# Altium PCB TYPEC_4KTransmitter-v1.0.PcbDoc (part 10 of 12)
Units mil, origin at the board's own origin, x right, y up, seen from the top; angles counter-clockwise.
Board outline 2834.7 x 1259.84 mil, 10 copper layers (Top Layer, GND-1, Signal L1, GND-2, PWR-1, PWR-2, GND-3, Signal L2, GND-4, Bottom Layer), stack 61.686 mil thick; 475 components, 338 nets, 2161 pads, 1240 vias.
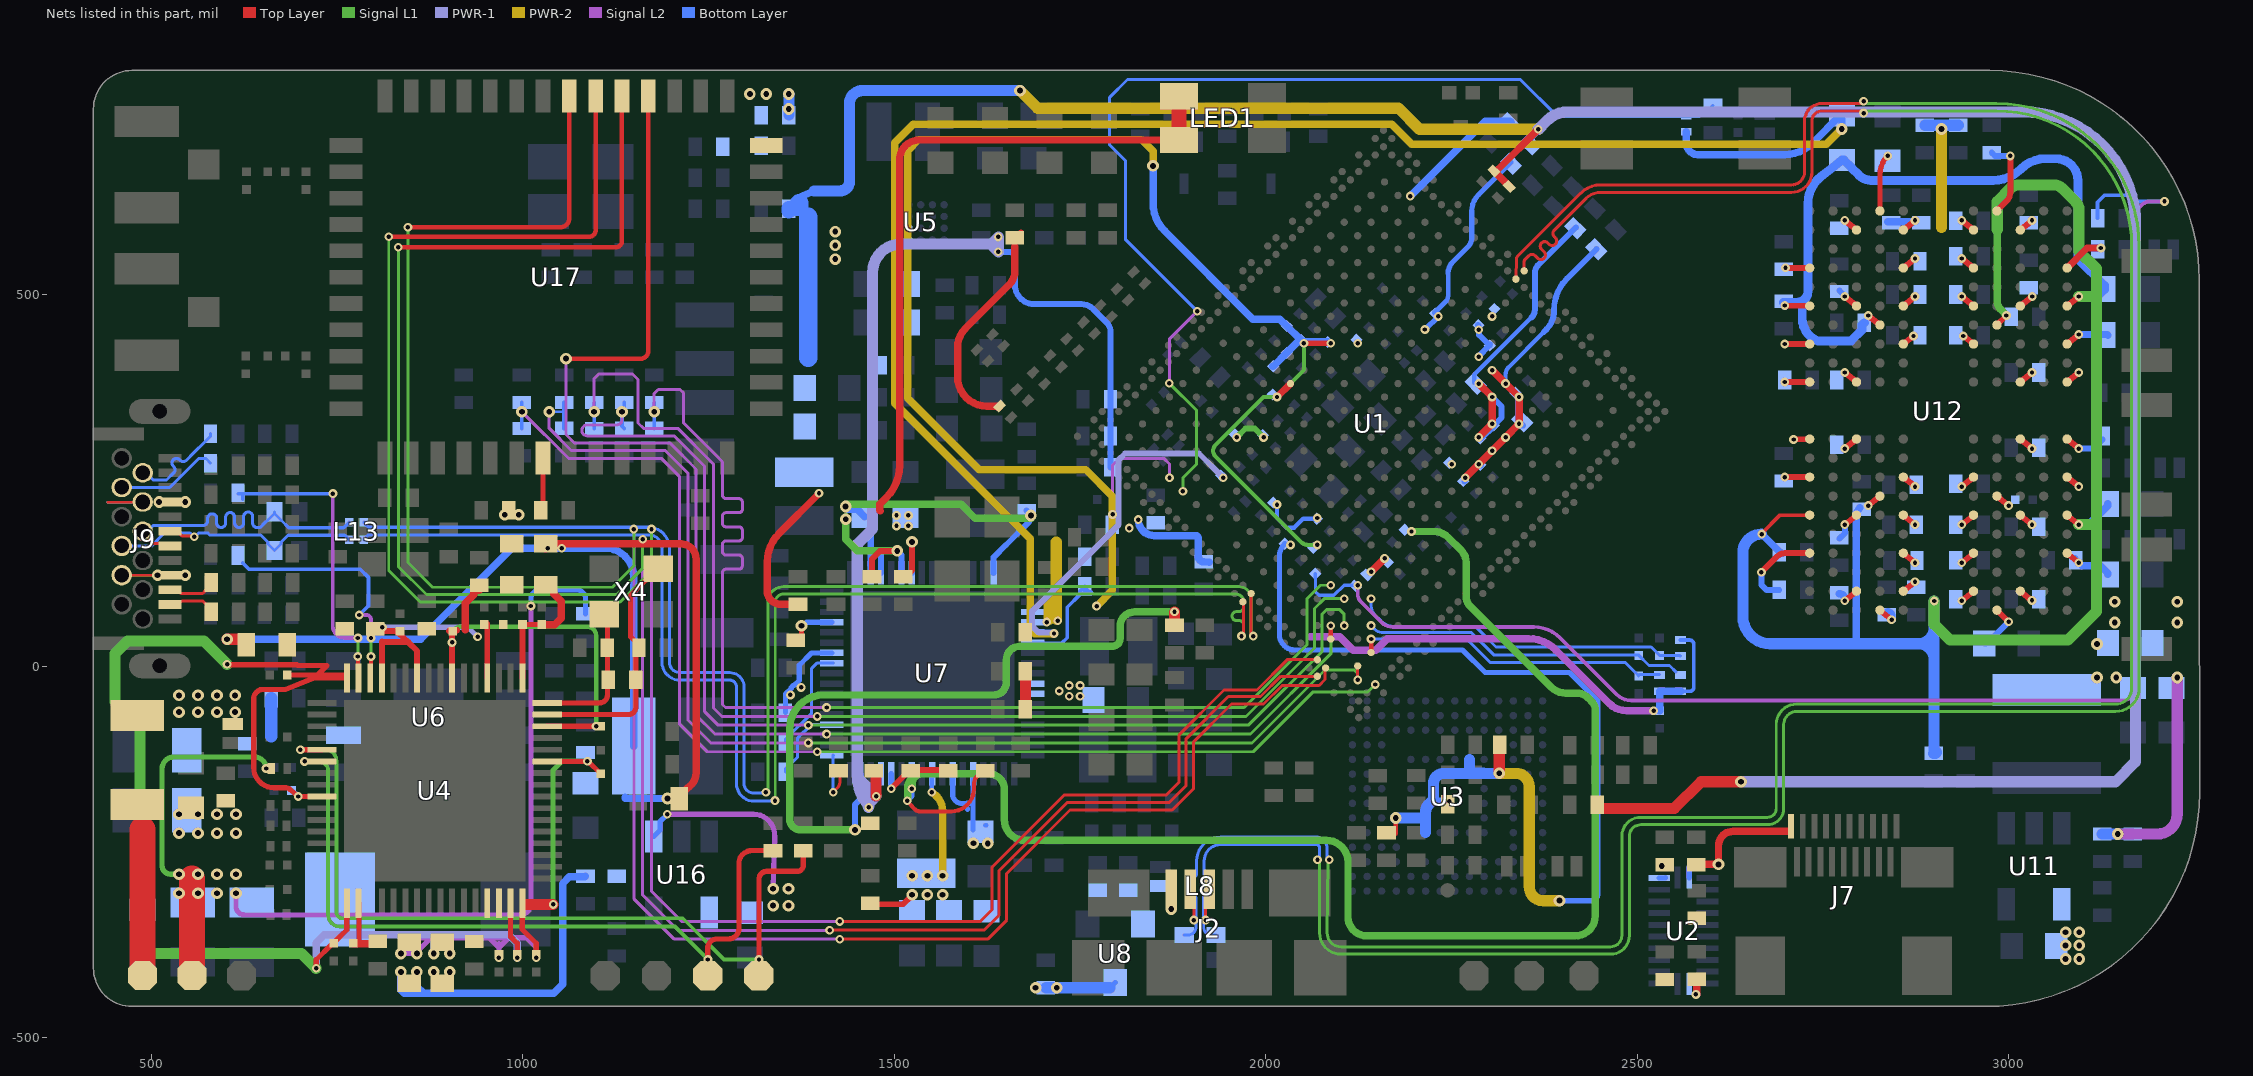
[diagram p16: the nets of this part, all layers, seen from the top]

## Via types
v1: diameter 11.81, hole 5.91, Top Layer to Bottom Layer, tented both sides, 710 vias
v2: diameter 15.75, hole 7.87, Top Layer to Bottom Layer, tented both sides, 265 vias
v3: diameter 11.81, hole 5.91, Top Layer to Signal L1, tented both sides, 146 vias
v4: diameter 11.81, hole 5.91, Signal L2 to Bottom Layer, 60 vias
v5: diameter 11.81, hole 5.91, Signal L1 to Signal L2, 38 vias
v6: diameter 11.81, hole 5.91, Top Layer to Signal L1, 16 vias
v7: diameter 11.81, hole 5.91, Top Layer to Bottom Layer, 4 vias
v8: diameter 11.81, hole 5.91, Signal L1 to Signal L2, tented both sides, 1 vias

## Nets (pads, with @x,y where several pads share a name; then routed paths per layer and width w, separated by ;. In a path a pad name is that pad's centre, name@x,y a point inside that pad or via, vN(x,y) a via of type N, cw(c..) or ccw(c..) an arc to the next point about the centre after c; other vN are vias at no path point) (continued)
SARADC_VIN0/RECOVERY: C156.1 R44.1 R60.1 U1.1D17 | length 2015.7
  Signal L2 w5: v1(2123.94,108.68) 2123.94,96.54 ccw(c2137.17,96.54) 2127.81,87.2 ; 2127.82,87.19 2156.27,58.74 ccw(c2170.99,73.46) 2170.99,52.64 2360.86,52.64 cw(c2360.86,2.34) 2396.41,37.92 ; 2396.42,37.91 2472.54,-38.21 ccw(c2492.17,-18.61) 2492.17,-46.35 3152.31,-46.35 ccw(c3152.31,-25.71) 3172.95,-25.71 3172.95,606.98 cw(c3191.3,606.98) 3191.3,625.32 v4(3209.87,625.32)
  Bottom Layer w4.5: C156.1@2066.81,124.04 2066.81,118.87 2067.15,118.53 2067.15,100.03 2072.17,95.01 2092,95.01 2105.84,108.85 2119.33,108.85 R60.1@2120.72,107.46
  Bottom Layer w5: R44.1@3119.81,602.53 3119.81,624.13 3129.21,633.53 3164.52,633.53 3172.72,625.32 v4(3209.87,625.32)
SARADC_VIN1/HW_ID: C157.1 R61.2 U1.1C17 | length 456.6
  Bottom Layer w4.1: v1(2142.04,90.59) 2142.04,81.15 ccw(c2159.94,81.15) 2147.28,68.49 2154.83,60.94 ccw(c2173.03,79.15) 2173.03,53.4 2282.31,53.4 2310.01,25.7 2353.13,25.7 2518.89,25.7 C157.1@2530.35,14.25 2557.58,14.25 R61.2@2558.6,13.23
SARADC_VIN2: C158.1 R62.2 U1.1B18 | length 435.9
  Bottom Layer w4.1: v1(2142.04,54.4) 2146.81,49.62 ccw(c2158.33,61.15) 2158.33,44.85 2277.11,44.85 2306.95,15.01 2501.59,15.01 2515.98,0.62 2543.68,0.62 R62.2@2552.67,-8.37
SARADC_VIN3: C159.1 R63.2 U1.1A19 | length 426.6
  Top Layer w6: U1.1A19@2142.04,18.2 v1(2142.04,36.3)
  Bottom Layer w4.1: v1(2142.04,36.3) 2270.83,36.3 2302.11,5.02 2483.81,5.02 2498.36,-9.52 2498.49,-9.52 2502.21,-13.24 C159.1@2502.21,-13.38 ; C159.1@2502.48,-11.61 R63.2@2530.11,-11.61
SCL_LT: R125.2 TP11.1 U4.21 | length 1083.6
  Top Layer w7: v3(700.96,-112.66) U4.21@729.93,-112.66 ; v3@1318.14,-394.28 1318.14,-286.77 cw(c1328.59,-286.77) 1328.59,-276.33 1369.82,-276.33 ccw(c1369.82,-268.46) 1377.68,-268.46 R125.2@1377.68,-248.51
  Signal L1 w5: v3(700.96,-112.66) 734.44,-112.66 cw(c734.44,-127.71) 749.49,-127.71 749.49,-331.57 ccw(c757.42,-331.57) 757.42,-339.49 1215.67,-339.49 1271.17,-394.99 v3(1318.16,-394.99)
SDA_LT: R126.2 TP12.1 U4.22 | length 1032.4
  Top Layer w7: v3(706.5,-128.41) U4.22@729.93,-128.41 ; TP12.1@1249.13,-416.62 1249.37,-416.62 v3(1249.37,-394.99) 1249.13,-394.99 1249.13,-379.92 cw(c1261.71,-379.92) 1261.71,-367.34 1277.19,-367.34 ccw(c1277.19,-353.45) 1291.08,-353.45 1291.08,-265.92 cw(c1308.49,-265.92) 1308.49,-248.51 R126.2@1336.98,-248.51
  Signal L1 w5: v3(706.5,-128.41) 707.42,-129.33 727.09,-129.33 cw(c727.09,-140.4) 738.16,-140.4 738.16,-334.66 ccw(c754.07,-334.66) 754.07,-350.58 1204.96,-350.58 v3(1249.37,-394.99)
SDMMC1_CLK: R68.1 U17.18 | length 70
  Top Layer w7: R68.1@1027.38,209.74 U17.18@1027.38,279.73
SDMMC1_CMD: R57.1 R135.2 U1.B35 | length 1605.8
  Signal L1 w4: v5(1396.45,-115.42) 1983.34,-115.42 2064.02,-34.74 2137.82,-34.74 v1(2147.61,-24.95)
  Signal L2 w4: v2(998.94,342.23) 1061.68,279.49 1186.6,279.49 1210.84,255.24 1210.84,-77.77 1248.49,-115.42 v5(1396.45,-115.42)
  Bottom Layer w5: R57.1@998.95,319.75 v2(998.94,342.23) R135.2@998.94,354.73
SDMMC1_D0: R80.1 R138.2 U1.1C19 | length 1605.7
  Signal L1 w4: v5(1384.66,-79.71) 1976.8,-79.71 2075.82,19.32 2075.82,69.68 2081.89,75.74 2099.83,75.74 2105.85,69.72 v1(2105.85,54.4)
  Signal L2 w4: v2(1133.68,342.23) 1133.68,331.42 cw(c1126.88,331.42) 1126.88,324.62 1087.41,324.62 ccw(c1087.41,316.95) 1079.73,316.95 ccw(c1086.81,316.95) 1086.81,309.87 1203.63,309.87 1245.12,268.38 1245.12,-61.54 1263.29,-79.71 v5(1384.66,-79.71)
  Bottom Layer w5: v2(1133.68,342.23) 1133.68,322.76 R80.1@1136.68,319.76 ; v2@1136.67,342.23 R138.2@1136.67,354.73
SDMMC1_D1: R81.1 R139.2 U1.1E18 | length 1605.7
  Signal L1 w4: v5(1409.18,-55.89) 1971.12,-55.89 2055.45,28.44 2055.45,90.23 2073.91,108.68 v1(2087.75,108.68)
  Signal L2 w4: v2(1177.11,342.23) 1177.11,366.77 1182.58,372.24 1211.93,372.24 1216.5,367.68 1216.5,327.28 1268.93,274.85 1268.93,230.08 ccw(c1273.68,230.08) 1273.68,225.33 1291.03,225.33 cw(c1291.03,220.58) 1295.78,220.58 1295.78,211.08 cw(c1291.03,211.08) 1291.03,206.33 1273.68,206.33 ccw(c1273.68,201.58) 1268.93,201.58 1268.93,192.08 ccw(c1273.68,192.08) 1273.68,187.33 1291.03,187.33 cw(c1291.03,182.58) 1295.78,182.58 1295.78,173.08 cw(c1291.03,173.08) 1291.03,168.33 1273.68,168.33 ccw(c1273.68,163.58) 1268.93,163.58 1268.93,154.08 ccw(c1273.68,154.08) 1273.68,149.33 1291.03,149.33 cw(c1291.03,144.58) 1295.78,144.58 1295.78,135.08 cw(c1291.03,135.08) 1291.03,130.33 1273.68,130.33 ccw(c1273.68,125.58) 1268.93,125.58 1268.93,-51.67 1273.15,-55.89 v5(1409.18,-55.89)
  Bottom Layer w5: R81.1@1177.11,319.76 R139.2@1177.11,354.73
SDMMC1_D2: R70.1 R137.2 U1.1D18 | length 1605.7
  Signal L1 w4: v5(1396.45,-67.8) 1973.5,-67.8 2065.68,24.38 2065.68,77.34 2078.93,90.59 v1(2105.85,90.59)
  Signal L2 w4: v2(1096.24,342.23) 1096.24,386.63 1102.62,393.01 1147.95,393.01 1155.46,385.5 1155.46,326.94 1162.54,319.86 1208.78,319.86 1257.02,271.62 1257.02,-56.6 1268.22,-67.8 v5(1396.45,-67.8)
  Bottom Layer w5: R70.1@1096.25,319.75 R137.2@1096.24,354.73
SDMMC1_D3: R69.1 R136.2 U1.1A20 | length 1605.7
  Top Layer w4: v1(2123.94,-18.73) U1.1A20@2123.95,0.11
  Signal L1 w4: v5(1384.66,-103.52) 1981.86,-103.52 2080.11,-5.26 2119.41,-5.26 2123.94,-9.8 v1(2123.94,-18.73)
  Signal L2 w4: v2@1035.71,342.13 1035.81,342.03 1035.81,320.02 1065.61,290.22 1192.03,290.22 1222.75,259.5 1222.75,-72.84 1253.42,-103.52 v5(1384.66,-103.52)
  Bottom Layer w4: v2(1035.81,342.23) 1055.81,342.23
  Bottom Layer w5: R69.1@1055.81,319.76 1055.81,342.23 R136.2@1055.81,354.73
SYNC_KEY: R39.1 R82.2 U1.1P20 | length 1466
  Signal L1 w4: v5(1870.45,380.69) 1906.88,344.27 1906.88,271.54 1888.71,253.37 v1(1888.71,235.35)
  Signal L2 w4.1: v5@1870.42,381.39 1870.42,439.91 v4(1907.89,477.38)
  Bottom Layer w4.1: v4(1907.89,477.38) 1811.7,573.57 1811.7,679.69 1790.06,701.33 1790.06,765.37 1814.21,789.52 2342.78,789.52 2392.53,739.77 2565.24,739.77 R82.2@2566.2,740.73 2567.17,739.77 2583.68,739.77 2591.64,747.73 2595.22,747.73 R39.1@2602.17,754.68
TSADC_SHUT_M0: R45.2 U1.1R20 | length 182.3
  Signal L2 w4: v4(1794.08,204.06) 1794.08,270.32 1803.27,279.51 1862.93,279.51 1870.61,271.83 v1(1870.61,253.44)
  Bottom Layer w4: R45.2@1793.68,190.07 1793.68,203.66 v4(1794.08,204.06)
TX1_N: C56.1 J9.A3 | length 63.5
  Top Layer w4.1: J9.A3@527.62,102.82 534.93,102.82 540.03,97.72 569.31,97.72 573.53,101.94 573.9,101.94 580.86,108.9 C56.1@580.86,112.42
TX1_P: C57.1 J9.A2 | length 63.1
  Top Layer w4.1: J9.A2@527.62,83.14 531.21,86.73 540.57,86.73 541.46,87.62 569.55,87.62 573.64,83.53 573.9,83.53 580.86,76.58 C57.1@580.86,73.11
TX2_N: C58.1 J9.B3 | length 136.4
  Bottom Layer w4.1: J9.B3@462.4,240.36 J9.B3@463.05,239.71 ; J9.B3@463.05,240.21 524.95,240.21 530.37,245.63 560.99,276.25 563.95,279.21 573.71,279.21 C58.1@579.86,273.06
TX2_P: C59.1 J9.B2 | length 136.5
  Bottom Layer w4.1: J9.B2@490.73,260.03 493.14,260.03 502.87,250.31 520.77,250.31 530.38,259.92 ccw(c526.1,264.19) 530.38,268.47 529.79,269.05 cw(c534.07,273.33) 529.79,277.61 cw(c534.07,273.33) 538.35,277.61 538.93,277.03 ccw(c543.21,281.31) 547.49,277.03 556.81,286.35 572.64,302.18 572.91,302.18 579.86,309.13 C59.1@579.86,312.63
TYPEC0_CC1: R116.1 U4.14 | length 331.9
  Top Layer w5.1: U4.14@794.89,-16.21 795.81,-15.29 795.81,12.64 v3(795.93,12.76)
  Signal L1 w4: v3(795.93,12.76) v5(795.93,37.69)
  Signal L2 w5: v4(780.04,68.58) 790.06,68.58 cw(c790.06,62.72) 795.93,62.72 v5(795.93,37.69)
  Bottom Layer w5: R116.1@623.36,138.73 631.72,130.37 781.57,130.37 792.68,119.27 792.68,81.22 v4(780.04,68.58)
TYPEC0_CC2: R117.1 U4.15 | length 405.9
  Top Layer w5.1: v3(778.11,12.76) 778.23,12.64 778.23,-15.3 U4.15@779.14,-16.21
  Signal L1 w4: v3@778.25,12.9 v5(778.25,37.69)
  Signal L2 w5: v4(744.6,232.03) 744.6,53.45 ccw(c760.36,53.45) 760.36,37.69 v5(778.25,37.69)
  Bottom Layer w5: R117.1@617.59,232.03 v4(744.6,232.03) ; R117.1@623.36,224.53 R117.1@623.36,228.03
U4_XTAL0: C1.2 R1.1 U4.63 X4.1 | length 330.1
  Top Layer w7: U4.63@1033.07,-65.42 1142.01,-65.42 ccw(c1142.01,-54.87) 1152.56,-54.87 1152.56,-18.7 C1.2@1152.56,24.77 ; C1.2@1153.56,25.77 1153.56,31.27 1151.06,33.77 1150.87,33.77 1145.25,39.38 1145.25,94.97 1166.38,116.09 1166.38,116.5 1180.18,130.3 X4.1@1182.56,130.3
U4_XTALI: C2.2 R1.2 U4.64 X4.3 | length 197.7
  Top Layer w7: U4.64@1033.07,-49.67 1103.64,-49.67 ccw(c1103.64,-39.21) 1114.1,-39.21 C2.2@1114.1,24.77 1114.1,65.32 X4.3@1109.73,69.7
UART1_CTS: U1.G37 U17.42 | length 2974.7
  Top Layer w4: v1(1426.98,-343.73) 1615.99,-343.73 1631.47,-328.25 1631.47,-271.08 1728.61,-173.94 1865.99,-173.94 1883.18,-156.75 1883.18,-93.27 1944.1,-32.35 1988.32,-32.35 2029.13,8.46 U1.G37@2069.66,8.46
  Top Layer w6: v3(819.82,577.66) 1089.35,577.66 ccw(c1089.35,586.55) 1098.25,586.55 U17.42@1098.25,767.13
  Signal L1 w4: v3(819.82,577.66) 819.82,128.51 862.07,86.26 1131.31,86.26 1173.48,128.43 v5(1173.48,184.29)
  Signal L2 w4: v5(1173.48,184.29) 1173.48,-303.17 1214.05,-343.73 v1(1426.98,-343.73)
UART1_RTS: U1.F37 U17.43 | length 2903.8
  Top Layer w4: v1(1426.96,-367.65) 1625.9,-367.65 1651.47,-342.08 1651.47,-279.36 1736.89,-193.94 1874.28,-193.94 1903.18,-165.03 1903.18,-102.01 1954,-51.19 1997.26,-51.19 2022.37,-26.08 2072.13,-26.08 2080.08,-18.13 2080.08,-3.39 U1.F37@2080.8,-2.67
  Top Layer w6: v3(845.63,590.64) 1050.82,590.64 ccw(c1050.82,602.63) 1062.81,602.63 U17.43@1062.81,767.13
  Signal L1 w4: v3(845.63,590.64) 845.63,139.2 878.84,105.99 1120.94,105.99 1149.67,134.73 v5(1149.67,184.29)
  Signal L2 w4: v5(1149.67,184.29) 1149.67,-313.18 1204.14,-367.65 v1(1426.96,-367.65)
UART1_RXD: U1.1C20 U17.40 | length 2090.8
  Top Layer w6: v2(1058.36,413.73) 1159.11,413.73 ccw(c1159.11,423.6) 1168.99,423.6 1168.99,746.98 U17.40@1169.11,767.13 ; U1.1C20@2087.76,36.3 v1@2087.76,54.39
  Signal L1 w4: v5(1409.18,-91.61) 1979.75,-91.61 2087.75,16.39 ; 2087.75,16.39 v1(2087.75,54.13) 2087.75,16.39
  Signal L2 w4: v2(1058.36,413.73) 1058.36,311.43 1069.9,299.88 1198.64,299.88 1233.47,265.05 1233.47,-66.2 1258.88,-91.61 v5(1409.18,-91.61)
UART1_TXD: U1.F38 U17.41 | length 2949
  Top Layer w4: v1(1413.13,-355.73) 1413.23,-355.64 1620.92,-355.64 1641.47,-335.09 1641.47,-275.22 1732.75,-183.94 1870.14,-183.94 1893.18,-160.89 1893.18,-97.86 1949.85,-41.19 1993.12,-41.19 2020.5,-13.81 U1.F38@2069.66,-13.81
  Top Layer w6: v3(832.73,563.72) 1125.64,563.72 ccw(c1125.64,571.76) 1133.68,571.76 U17.41@1133.68,767.13
  Signal L1 w4: v3(832.73,563.72) 832.73,133.86 870.5,96.08 1126.25,96.08 1161.58,131.41 v5(1161.58,170.46)
  Signal L2 w4: v5(1161.58,170.46) 1161.58,-308.17 1209.1,-355.68 v1@1413.18,-355.68
USB2.0_D_N: D6.1 J2.2 L8.4 | length 118.8
  Top Layer w4.1: J2.2@1898.58,-300.61 cw(c1898.58,-305.5) 1903.47,-305.5 v1(1903.47,-341.97)
  Bottom Layer w4.1: D6.1@1890.53,-362.16 1895.5,-362.16 ccw(c1895.5,-351.34) 1906.33,-351.34 1906.33,-344.83 ccw(c1903.47,-344.83) v1(1903.47,-341.97) ccw(c1903.47,-339.15) 1906.3,-339.15 1906.3,-312.57 ccw(c1899.54,-312.57) L8.4@1899.54,-305.81
USB2.0_D_P: D7.1 J2.3 L8.3 | length 119.7
  Top Layer w4.1: v1(1919.29,-341.97) 1919.29,-305.5 cw(c1924.17,-305.5) J2.3@1924.17,-300.61
  Bottom Layer w4.1: L8.3@1923.16,-305.81 ccw(c1923.16,-312.57) 1916.4,-312.57 1916.4,-339.08 ccw(c1919.29,-339.08) v1(1919.29,-341.97) ccw(c1919.29,-344.83) 1916.43,-344.83 1916.43,-351.34 ccw(c1927.26,-351.34) 1927.26,-362.16 D7.1@1933.15,-362.16
USB2_HOST2_D_N: L8.2 U1.V1 | length 3450.1
  Top Layer w4.1: U1.V1@2348.05,531.83 2348.05,544.4 cw(c2352.15,544.4) 2348.94,546.95 2354.27,552.27 cw(c2358.54,547.99) 2362.82,552.27 2366.33,548.76 ccw(c2370.61,553.04) 2374.89,557.32 2371.38,560.83 cw(c2375.66,565.11) 2379.93,569.38 2381.57,567.75 ccw(c2385.84,572.03) 2390.12,576.31 2388.49,577.94 cw(c2392.77,582.22) 2388.49,586.5 2431.41,629.42 cw(c2450.83,610) 2446.49,637.12 cw(c2450.83,610) 2448.54,637.37 2450.83,637.46 2707.93,637.46 ccw(c2707.93,664.96) 2735.43,664.96 2735.43,733.57 cw(c2748.9,733.57) 2748.9,747.04 2802.05,747.04 cw(c2802.05,744.19) v3(2804.91,744.19)
  Signal L1 w4: v1(2085.74,-260.82) 2085.49,-260.92 2083.83,-262.58 2082.83,-359.45 ccw(c2101.28,-359.45) 2101.28,-377.9 2464.34,-377.9 ccw(c2464.34,-362.71) 2479.53,-362.71 2479.53,-229.13 cw(c2505.04,-229.13) 2505.04,-203.62 2675.43,-203.62 ccw(c2675.43,-191.72) 2687.33,-191.72 2687.33,-78.59 cw(c2714.68,-78.59) 2714.68,-51.24 3144.2,-51.24 ccw(c3144.2,-29.67) 3165.77,-29.67 3165.77,565.18 ccw(c2983.86,565.18) 2983.86,747.09 2807.81,747.09 ccw(c2807.81,744.19) v3(2804.91,744.19)
  Bottom Layer w4.1: L8.2@1899.54,-286.12 ccw(c1899.54,-278.5) 1907.15,-278.5 1907.15,-262.48 cw(c1939.4,-262.48) 1939.4,-230.24 2068.1,-230.24 cw(c2068.1,-244.44) 2078.14,-234.4 2078.72,-234.98 cw(c2068.68,-245.03) 2082.88,-245.03 2082.88,-257.97 ccw(c2085.74,-257.97) v1(2085.74,-260.82)
USB2_HOST2_D_P: L8.1 U1.V2 | length 3450.7
  Top Layer w4.1: U1.V2@2336.92,520.7 2337.95,549.72 2339.44,551.73 2424.3,636.59 cw(c2450.77,610.15) 2450.77,647.56 2509.04,647.56 2707.93,647.56 ccw(c2707.93,664.96) 2725.33,664.96 2725.33,733.57 cw(c2748.9,733.57) 2748.9,757.14 2802.05,757.14 ccw(c2802.05,760) v3(2804.91,760)
  Signal L1 w4: v1(2069.93,-260.82) cw(c2069.93,-263.73) 2072.83,-263.73 2072.83,-359.45 ccw(c2101.28,-359.45) 2101.28,-387.9 2464.34,-387.9 ccw(c2464.34,-362.71) 2489.53,-362.71 2489.53,-229.13 cw(c2505.04,-229.13) 2505.04,-213.62 2675.43,-213.62 ccw(c2675.43,-191.72) 2697.33,-191.72 2697.33,-78.59 cw(c2714.68,-78.59) 2714.68,-61.24 3144.2,-61.24 ccw(c3144.2,-29.67) 3175.77,-29.67 3175.77,565.18 ccw(c2983.86,565.18) 2983.86,757.09 2807.81,757.09 cw(c2807.81,760) v3(2804.91,760)
  Bottom Layer w4.1: L8.1@1923.16,-286.12 cw(c1923.16,-280.21) 1917.25,-280.21 1917.25,-262.48 cw(c1939.4,-262.48) 1939.4,-240.34 2068.1,-240.34 cw(c2068.1,-244.44) 2070.99,-241.54 2071.58,-242.13 cw(c2068.68,-245.03) 2072.78,-245.03 2072.78,-257.97 cw(c2069.93,-257.97) v1(2069.93,-260.82)
USB_5V: D31.1 F1.1 J9.A4 J9.A9 J9.B4 J9.B9 | length 237.6
  Top Layer w3.5: 441.96,220.66 J9.B4@488.73,220.66 ; J9.B9@460.4,122.25 v2(508.73,122.25)
  Top Layer w4: v2@508.3,121.81 v2(508.73,122.25)
  PWR-1 w3.5: 441.96,220.66 J9.B4@488.73,220.66
  PWR-2 w3.5: 441.96,220.66 J9.B4@488.73,220.66 ; J9.B9@460.4,122.25 v2(508.73,122.25)
  other v2: 537.46,-62.07 563,-62.07 588.55,-62.07 613.09,-62.07 537.46,-39.53 563,-39.53 588.55,-39.53 613.09,-39.53 545.98,122.25 510.73,220.67 545.98,220.67
USB_D_N: D30.1 J9.A7 J9.B7 L13.3 | length 374.8
  Top Layer w4.1: J9.A7@525.36,181.3 535.47,181.3 541.97,174.79 557.19,174.79 v1(558.08,173.91)
  Bottom Layer w4.1: J9.B7@462.4,161.62 462.74,161.27 500.11,161.27 518.05,179.21 551.82,179.21 555.55,175.49 v1@558.08,175.49 ; v1(558.08,173.91) 559.03,173.91 564.33,179.21 575.62,179.21 578.49,176.34 647.53,176.34 657.17,166.7 657.17,164.3 D30.1@665.95,155.53 674.72,164.3 674.72,166.5 684.23,176.01 760.42,176.01 L13.3@766.55,169.87
USB_D_P: D29.1 J9.A6 J9.B6 L13.4 | length 435
  Top Layer w4.1: J9.B6@488.73,181.29 488.73,179.08 502.85,164.96 524,164.96 J9.A6@527.36,161.61
  Bottom Layer w4.1: J9.B6@488.73,181.29 495.24,181.29 503.26,189.31 567.98,189.31 570.03,189.31 ccw(c570.03,195.36) 576.08,195.36 576.08,198.83 cw(c582.13,198.83) 588.18,198.83 588.18,192.49 ccw(c594.23,192.49) 600.28,192.49 600.28,200.47 cw(c606.33,200.47) 612.38,200.47 612.38,192.49 ccw(c618.43,192.49) 624.48,192.49 624.48,201.3 cw(c630.53,201.3) 636.58,201.3 636.58,192.49 636.79,190.9 ccw(c642.63,192.49) 642.63,186.44 646.71,186.44 653.73,193.46 656.85,196.58 657.18,196.58 D29.1@665.96,205.36 ; D29.1@665.96,207.53 D29.1@665.96,205.36 ; L13.4@766.55,193.49 759.17,186.11 685.29,186.11 674.81,196.58 674.74,196.58 D29.1@665.96,205.36
USB_OTG0_D_N: L13.1 U1.R38 | length 1910.3
  Top Layer w4.1: v3(1967.54,40.27) ccw(c1967.54,43.18) 1968.54,40.45 ccw(c1967.54,43.18) 1970.44,43.18 1970.44,85.41 U1.R38@1969.44,86.41
  Signal L1 w4: v1@1338.63,-181.17 cw(c1339.81,-181.17) 1339.81,-179.99 1340.01,-179.99 1340.01,85.68 cw(c1351.16,85.68) 1351.16,96.82 1960.19,96.82 cw(c1960.19,86.57) 1970.44,86.57 1970.44,79.33 cw(c1964.39,79.33) 1964.39,73.28 1960.97,73.28 ccw(c1960.97,67.23) 1960.97,61.18 1964.39,61.18 cw(c1964.39,55.13) 1970.44,55.13 1970.44,43.18 cw(c1967.54,43.18) v3(1967.54,40.27)
  Bottom Layer w4.1: L13.1@786.24,169.87 790.1,173.73 790.1,174.23 792.5,176.63 1169.43,176.63 cw(c1169.45,158.63) 1187.45,158.63 1187.45,5.33 ccw(c1211.86,5.33) 1211.86,-19.08 1278.91,-19.08 cw(c1278.91,-28.04) 1287.87,-28.04 1287.87,-158.08 1287.87,-158.14 ccw(c1311.68,-158.14) 1311.75,-181.95 1338.85,-181.95 v1(1339.63,-181.17)
USB_OTG0_D_P: L13.2 U1.R37 | length 1910.3
  Top Layer w4.1: U1.R37@1980.58,97.55 1980.58,43.04 ccw(c1983.35,43.04) v3(1983.35,40.27)
  Signal L1 w4: v1(1327.45,-169.99) ccw(c1327.45,-167.43) 1330.01,-167.43 1330.01,85.68 cw(c1351.16,85.68) 1351.16,106.82 1964.33,106.82 cw(c1964.33,90.71) 1980.44,90.71 1980.44,43.18 ccw(c1983.35,43.18) v3(1983.35,40.27)
  Bottom Layer w4.1: L13.2@786.24,193.49 790.1,189.64 790.1,189.13 792.5,186.73 1169.43,186.73 cw(c1169.45,158.63) 1197.55,158.63 1197.55,5.33 ccw(c1211.86,5.33) 1211.86,-8.98 1278.91,-8.98 cw(c1278.91,-28.04) 1297.97,-28.04 1297.97,-157.99 ccw(c1311.02,-157.99) 1311.02,-171.03 1326.41,-171.03 v1(1327.45,-169.99)
VCC0V6_DDR: C109.2 C111.2 C113.2 C115.2 C117.2 C179.2 C198.2 C200.2 C202.2 C205.1 C207.2 C209.2 C211.2 C213.2 C215.2 C218.2 C221.2 C223.2 C225.2 C227.2 C229.2 C233.2 C237.2 C242.2 C249.2 C250.2 C254.2 C255.2 C256.2 C300.2 L10.2 R98.1 R100.2 R102.2 R103.2 U1.1E6 U1.1E7 U1.1E9 U1.1F5 U1.1G5 U12.AA3 U12.AA5 U12.AA8 U12.AA10 U12.B3 U12.B5 U12.B8 U12.B10 U12.D1 U12.D5 U12.D8 U12.D12 U12.F3 U12.F10 U12.U3 U12.U10 U12.W1 U12.W5 U12.W8 U12.W12 | length 1639.8
  Top Layer w8: v1(2667.36,126.31) 2688.55,147.5 cw(c2699.16,136.9) 2699.16,151.9 U12.W1@2732.35,151.9 ; v1(2699.72,536.05) 2699.87,535.91 2732.21,535.91 U12.D1@2732.35,535.76 ; v1(2779.6,87.92) U12.AA3@2795.34,100.72 ; v1(2779.6,190.28) U12.U3@2795.35,203.08 ; v1(2779.6,497.37) U12.F3@2795.34,484.58 ; v1(2779.6,599.73) U12.B3@2795.34,586.94 ; U12.AA5@2858.34,100.72 v1(2874.09,113.49) ; U12.W5@2858.34,151.9 v1(2874.09,139.1) ; U12.D5@2858.34,535.76 v1(2874.09,548.51) ; U12.B5@2858.34,586.94 v1(2874.09,599.73) ; v1(2937.08,87.92) U12.AA8@2952.82,100.72 ; v1(2937.08,139.1) U12.W8@2952.82,151.9 ; v1(2937.08,548.55) U12.D8@2952.82,535.76 ; v1(2937.08,599.73) U12.B8@2952.82,586.94 ; U12.AA10@3015.82,100.72 v1@3031.15,88.26 ; U12.U10@3015.82,203.08 v1(3031.57,190.28) ; U12.F10@3015.82,484.58 v1@3031.57,497.37 ; U12.B10@3015.82,586.94 v1(3031.57,599.73) ; U12.W12@3078.81,151.9 v1(3094.56,139.1)
  Top Layer w10: v1(2286.8,307.73) 2300.5,321.43 ccw(c2289.9,332.04) U1.1E6@2303.76,326.3 ; v1(2286.8,380.11) v1(2304.9,362.02) ; U1.1E6@2304.05,326.18 2304.74,326.18 2305.24,326.68 U1.1F5@2305.24,361.68 ; U12.D12@3078.81,535.76 3105.64,562.58 v1(3124.31,562.58)
  PWR-2 w15: 2909.86,590.4 v2(2909.86,722.86)
  Signal L2 w15: v2(3146.9,-226.14) 3199.96,-226.14 ccw(c3200.01,-199.16) 3226.98,-199.77 3226.98,-199.64 v2(3226.98,-15.49)
  Bottom Layer w5.7: C115.2@2280.68,392.04 2357.96,469.32
  Bottom Layer w6: C115.2@2280.68,381.04 C115.2@2280.68,391.44
  Bottom Layer w8: v1(2286.8,380.11) 2317.5,349.41 2317.5,334.37 C109.2@2308.95,325.83 ; v1(2304.9,325.83) C109.2@2308.95,325.83 ; C109.2@2308.59,325.46 C109.2@2308.95,325.83 ; 2357.96,469.32 2358.39,469.75 ccw(c2348.8,479.33) 2362.36,479.33 2362.36,528.81 cw(c2377.36,528.81) 2366.74,539.41 C117.2@2417.81,590.48 ; v1(2667.36,126.31) 2667.36,109.27 2674.1,102.53 C202.2@2691.36,102.53 ; C207.2@2772.36,171.27 2779.86,178.77 2779.86,190.03 v1(2779.6,190.28) ; C229.2@2772.36,505.49 2779.6,498.24 v1(2779.6,497.37)
  Bottom Layer w10: v1(2286.8,307.73) C111.2@2290.57,307.73 ; C111.2@2289.85,307.01 C111.2@2290.57,307.73 ; C109.2@2305.63,324.1 C109.2@2305.98,324.1 ; C109.2@2306.3,324.42 2306.46,324.27 2306.46,323.62 C111.2@2290.57,307.73 ; C237.2@2772.36,97.07 cw(c2772.36,89.82) 2779.6,89.82 v1(2779.6,87.92) ; C227.2@2837.36,597.99 2872.34,597.99 v1(2874.09,599.73) ; C221.2@3088.81,144.66 C221.2@3095.18,138.29 ; v1(3094.56,139.1) C221.2@3095.05,139.1 ; C221.2@3099.02,135.13 3123.66,135.13 3133.66,125.13 C255.2@3133.66,123.3
  Bottom Layer w15: R103.2@2887.36,727.86 R102.2@2932.36,727.86 ; C254.2@3126.19,-226.07 R100.2@3167.35,-226.06
  other v1: 3031.57,88.3 2250.61,271.54 3031.97,497.37
  other v2: 3118.98,-15.49 3144.98,-15.49 3226.98,58.51 3226.98,86.51
VCC1V8_DDR: C230.2 C231.2 C234.2 C235.2 C239.2 C240.2 C243.2 C244.2 R99.2 R104.2 U12.F1 U12.F12 U12.G4 U12.G9 U12.T4 U12.T9 U12.U1 U12.U12 | length 3251.2
  Top Layer w5: v1(2667.76,177.49) 2667.76,178.44 2692.4,203.08 U12.U1@2732.36,203.08
  Top Layer w8: v1(2698.81,485.23) 2699.14,484.9 2732.03,484.9 U12.F1@2732.35,484.58 ; v1(2811.1,215.87) U12.T4@2826.84,228.67 ; v1(2811.1,471.78) U12.G4@2826.84,458.99 ; U12.T9@2984.32,228.67 v1(3000.07,215.87) ; U12.G9@2984.32,458.99 v1(2997.16,471.78) ; U12.U12@3078.81,203.08 v1(3094.56,190.28) ; U12.F12@3078.81,484.58 v1(3094.56,497.37)
  Signal L1 w10: 2984.86,587.4 2984.86,490.71 ccw(c2999.86,490.71) 2989.24,480.11 2997.16,472.19 v1(2997.16,471.78)
  Signal L1 w15: v1(2899.86,87.53) 2899.86,56.26 2921.02,35.1 3079.93,35.1 3118.16,73.34 3118.16,190.28 ; 2984.86,587.4 2984.86,625.03 3002.97,643.14 cw(c3013.57,632.53) 3013.57,647.53 3061.14,647.53 cw(c3061.14,632.53) 3071.74,643.14 3090.47,624.42 cw(c3079.86,613.82) 3094.86,613.82 3094.86,558.09 3118.16,534.78 3118.16,497.37 ; v1(3094.56,190.28) 3118.16,190.28 ; v1(3094.56,497.37) 3118.16,497.37 ; 3118.16,190.28 3118.16,497.37
  Bottom Layer w8: v1@2667.36,177.49 v1@2668.16,177.49
  Bottom Layer w10: v1@2668.16,177.49 C235.2@2692.82,152.83 ; 2793.14,30.03 2794.86,31.74 2794.86,200.72 cw(c2811.93,200.72) C243.2@2799.86,212.79 ; v1(3094.56,190.28) 3106.97,190.28 3122.47,205.78 3123.66,205.78 3133.66,215.78 C230.2@3133.66,218.28
  Bottom Layer w12: C240.2@2697.36,489.53 C240.2@2698.81,489.53 ; v1(2698.81,485.23) C240.2@2698.81,489.53 ; 2722.36,489.53 2722.36,468.11 ccw(c2755.35,468.11) 2743.2,437.44 2787.77,437.44 2802.86,452.52 2802.86,459.03 C244.2@2805.86,462.03 ; R104.2@2775.86,681.03 2763.36,671.03 2747.66,658.85 ccw(c2775.86,622.5) 2729.86,622.5 2729.86,503.93 cw(c2715.46,503.93) 2715.46,489.53 C240.2@2698.81,489.53 ; R104.2@2778.36,681.03 2788.36,671.03 2788.36,670.8 2798.88,660.28 ccw(c2814.86,676.26) 2814.86,653.66 2979.34,653.66 ccw(c2979.34,706.59) 3016.76,669.17 cw(c3049.52,636.41) 3049.52,682.73 3063.98,682.73 cw(c3063.98,653.4) 3084.7,674.16 ; 3084.72,674.14 cw(c3063.98,653.4) 3093.32,653.4 3093.32,547.98 3129.17,512.13 C231.2@3129.17,507.52 ; v1(3094.56,497.37) 3112.8,497.37 ccw(c3112.8,512.37) 3123.41,501.76 C231.2@3129.17,507.52 ; C231.2@3129.17,506.99 C231.2@3129.17,507.52 ; C231.2@3129.21,507.57 C231.2@3129.17,507.52
  Bottom Layer w15: v1@2667.36,177.49 ccw(c2667.36,152.49) 2642.36,152.49 2642.36,66.96 ccw(c2679.29,66.96) 2679.29,30.03 2793.14,30.03 2878.64,30.03 ; R99.2@2899.07,-117.63 2901.36,-117.63 R99.2@2902.86,-116.13 ; R99.2@2899.86,-116.13 2899.86,8.82 ; v1(2899.86,87.53) 2899.86,51.24 ; 2878.64,30.03 ccw(c2878.64,51.24) 2899.86,51.24 ; 2878.64,30.03 cw(c2878.64,8.82) 2899.86,8.82 ; 2899.86,8.82 2899.86,51.24
VCC3V3_PMU: C20.2 C118.2 C123.2 R6.1 R7.1 R12.2 R22.1 R109.1 U1.1N15 U1.1P16 U7.31 | length 1795.3
  Top Layer w8: R12.2@1661.09,575.24 R12.2@1662.36,576.53 ; R12.2@1662.36,576.53 1665.86,576.53 1670.86,581.53 R12.2@1670.86,583.76
  Top Layer w10: 1596.94,361.34 cw(c1624.71,389.1) 1585.44,389.1 1585.44,428.99 cw(c1621.2,428.99) 1595.94,454.29 1655.08,513.44 ccw(c1637.14,531.36) 1662.51,531.36 1662.51,563.88 1662.36,564.03 ; 1596.96,361.32 ccw(c1624.87,389.26) 1624.87,349.77 1638.93,349.77 1640.32,348.38 1640.76,348.38 R22.1@1642.16,349.77
  Top Layer w15: C20.2@1472.68,-140.76 1474.36,-140.76 1475.86,-142.26 v1(1475.86,-175.17)
  Signal L1 w8: v1(1961.09,307.73) 1972.96,319.6 1985.41,319.6 v1(1997.28,307.73)
  PWR-1 w15: v1@1463.73,-185.34 cw(c1510.41,-147.77) 1450.48,-147.77 ; v1(1465.73,-190.34) cw(c1477.88,-190.34) 1469.28,-181.75 ; 1469.29,-181.74 v1(1475.86,-175.17) 1460.27,-159.59 1451.92,-151.24 cw(c1455.39,-147.77) 1450.48,-147.77 ; 1632.36,565.49 v1(1640.32,557.53) v1@1640.32,575.07 ; 1632.36,568.03 1509.52,568.03 ccw(c1509.52,529.61) 1471.11,529.61 1471.11,184.6 1450.48,163.97 1450.48,-147.77 ; 1632.36,569.57 v1(1640.32,577.53)
  Bottom Layer w8: v1(1640.32,557.53) 1654.21,557.53 cw(c1654.21,549.23) 1662.51,549.23 1662.51,513.5 1662.51,513.44 ccw(c1689.14,513.44) 1675.75,490.41 ccw(c1688.24,511.9) 1688.24,487.05 1752.32,487.05 cw(c1752.32,465.64) 1767.46,480.78 ; 1767.49,480.74 1786,462.24 ; 1786.02,462.22 cw(c1773.5,449.73) 1791.18,449.73 R109.1@1791.18,358.97 R7.1@1791.18,309.58 R6.1@1791.18,267.26
VCC3V3_SD: C25.2 U7.58 | length 90.9
  Top Layer w8: C25.2@1512.35,120.1 1515.85,120.1 1524.11,128.35 v2(1524.11,167.08)
  Bottom Layer w8: U7.58@1523.71,125.27 1523.91,125.47 1523.91,161.88 v2@1524.11,162.08
VCC3V3_SYS: C8.2 C14.2 C18.2 C22.2 C26.2 C30.2 C32.2 C65.1 C66.1 C67.2 C68.2 C81.2 C82.2 C196.2 C290.2 FB1.1 FB2.1 L12.2 LED1.2 LED1.4 R32.1 R110.1 TP7.1 U7.4 U7.10 U7.11 U7.22 U7.24 U7.30 U7.45 U7.54 U7.57 U7.66 U11.4 U16.1 U16.4 | length 3809.9
  Top Layer w8: C22.2@1470.43,120.26 1470.43,144.28 1481.15,155 v2(1504.24,155) ; v1@1496.07,-164.83 1514.18,-146.72 1514.18,-145.76 1520.04,-139.9 1572.68,-139.9 C14.2@1575.63,-139.9
  Top Layer w10: 1481.18,208.66 1480.51,209.34 1480.51,217.62 1489.46,226.57 ccw(c1446.27,269.76) 1507.35,269.76 1507.35,681.05 cw(c1534.3,681.05) 1534.3,708 LED1.2@1883.6,708
  Top Layer w20: LED1.2@1883.6,708 LED1.4@1883.6,767.06
  Top Layer w35: TP7.1@555.11,-416.63 555.11,-285.89
  Signal L1 w7: v2@541.46,-280.28 v2(537.46,-280.28) 526.2,-280.28 cw(c526.2,-268.87) 514.79,-268.87 514.79,-138.22 cw(c530.51,-138.22) 530.51,-122.5 639.34,-122.5 cw(c639.34,-137.91) 645.79,-123.92 cw(c639.34,-137.91) v3(654.74,-137.91)
  Signal L1 w10: v2@1434.79,200.61 1434.79,170.86 1450.65,155 v2(1504.24,155) v2@1505.4,155 ; v2@1434.79,217.62 1590.33,217.62 1608.84,199.11 v2@1684.62,199.11
  PWR-2 w15: v1@1708.47,62.41 1708.47,81.65 1717.8,90.98 1717.8,91.33 ; v1@1718.15,63.26 1718.15,90.98 1718.15,166.58
  Signal L2 w7: v2@614.25,-305.99 614.25,-323.5 ccw(c625.81,-323.5) 625.81,-335.06 995.56,-335.06 ccw(c995.56,-319.52) 1011.1,-319.52 v4(1011.1,80.7) ; v4(1194.8,-199.49) 1310.62,-199.49 cw(c1310.78,-228.01) 1339.25,-229.54 1339.22,-230.08 v2(1337.14,-299.71)
  Bottom Layer w6: C68.2@1622.83,-214.61 C68.2@1624.36,-214.61
  Bottom Layer w7: v4(1011.1,80.7) 1011.33,80.93 1011.33,90.56 cw(c1023.02,90.56) 1023.02,102.25 1072.91,102.25 cw(c1072.91,90.56) 1084.6,90.56 R32.1@1084.6,70.31 ; U16.1@1176.49,-229.41 1184.8,-221.1 1184.8,-209.49 v4(1194.8,-199.49) ; C32.2@1353.68,-62.77 1353.68,-37.88 1361.47,-30.09 1361.47,-28.95 1363.99,-26.44 1365.13,-26.44 1372.26,-19.3 1372.26,1.05 1388.79,17.59 U7.45@1416.03,17.59 ; U7.24@1578.83,-145.21 1578.83,-157.95 1578.83,-172.6 ccw(c1591.25,-172.61) 1589.68,-184.93 ccw(c1590.4,-178.97) 1590.35,-184.97 1596.88,-184.97 ; 1596.92,-184.97 ccw(c1596.88,-175.46) 1606.39,-175.46 ; 1598.68,-193.3 ccw(c1590.35,-193.3) 1590.4,-184.97 1606.39,-184.97 ; C68.2@1606.39,-220.37 1606.39,-184.97 ; U7.22@1606.39,-145.21 1606.39,-184.97
  Bottom Layer w7.5: U7.54@1468.59,138.44 U7.54@1468.59,125.27 U7.54@1468.77,125.45
  Bottom Layer w8: v1(1496.15,-165.25) U7.30@1496.15,-145.21 ; v2(1504.24,155) 1509.93,149.31 U7.57@1509.93,125.27 ; U7.66@1633.95,125.27 1633.95,146.37 1650.44,162.86 1650.53,162.86 1681.3,193.63 1681.3,203.66 1682.55,204.91 C67.2@1678.42,209.03
  Bottom Layer w9: U7.54@1468.52,136.02 C30.2@1468.52,194.21
  Bottom Layer w10: v2@1434.79,212.62 1436.35,212.62 1437.89,211.07 1450.18,211.07 C30.2@1460.18,201.07
  other v1: 1735.85,-40.75 1750.35,-40.75 1722.25,-33.69 1735.85,-26.25 1750.35,-26.25 1705.6,59.05 1720.15,61.05
  other v2: 880.42,-411.69 901.97,-411.69 3076.8,-394.26 3095.08,-394.26 3076.8,-375.98 3095.08,-375.98 3076.8,-358.26 3095.08,-358.26 1337.14,-322.55 1357.73,-322.55 537.46,-305.83 563,-305.83 588.55,-305.83 614.09,-305.83 1357.73,-299.71 563,-280.28 588.55,-280.28 614.09,-280.28 1606.63,-238.6 1626.05,-238.7 1434.84,197.61 1684.12,202.61 975.89,203.66 994.81,203.66 1434.79,214.62
  other v7: 1360.45,-38.84 1374.83,-28.84
VCC5V0_SYS: C9.2 C12.2 C38.1 C79.2 C80.2 C85.2 C86.2 C164.2 C175.1 C186.2 F1.2 R5.2 R17.2 R38.2 TP1.1 U2.10 U5.D1 U5.D2 U5.E1 U5.E2 U6.2 U7.33 U8.3 | length 1292.2
  Top Layer w15: R17.2@1877.36,55.03 v3(1877.36,72.88)
  Top Layer w35: TP1.1@488.46,-416.63 488.46,-219.95
  Signal L1 w10: v2@1442.36,-220.51 1373.88,-220.51 cw(c1373.88,-206.09) 1359.47,-206.09 1359.47,-84.63 cw(c1405.07,-84.63) 1405.07,-39.03 1633.97,-39.03 ccw(c1633.97,-21.95) 1651.05,-21.95 1651.05,8.33 cw(c1669.19,8.33) 1669.19,26.47 1793.53,26.47 ccw(c1793.53,37.13) 1804.18,37.13 1804.18,53.43 cw(c1823.63,53.43) 1823.63,72.88 v3(1877.36,72.88)
  Bottom Layer w7: 659.61,-96.48 ccw(c659.61,-94.28) 661.81,-94.28 ; U8.3@1790.54,-433.08 U8.3@1797.65,-425.97 ; U2.10@2529.88,-285.41 2537.73,-285.41 U2.10@2538.17,-284.97
  Bottom Layer w8: v2@1447.49,-220.37 1447.49,-186.18 1454.81,-178.86 U7.33@1454.81,-145.21
  Bottom Layer w15: C164.2@1704.38,-433.08 v2(1718.85,-433.08) U8.3@1790.54,-433.08
  Bottom Layer w17: 661.81,-94.28 R38.2@661.81,-43.28
  other v2: 1690.53,-433.08 2533.17,-269.01 537.46,-224.99 563,-224.99 588.55,-224.99 614.09,-224.99 1447.36,-220.51 537.46,-199.45 563,-199.45 588.55,-199.45 614.09,-199.45 1420.76,547.65 1420.76,566.15 1420.76,584.65
VCC5V_HDMI: C189.1 J7.19 U2.12 | length 216.9
  Top Layer w10: C189.1@2579.65,-267.64 C189.1@2580.02,-268.01 ; C189.1@2580.02,-267.01 v2(2609.6,-267.01) 2609.6,-242.08 cw(c2629.12,-242.08) 2629.12,-222.56 J7.19@2705.23,-222.56
  Bottom Layer w8: U2.12@2570.23,-284.42 2570.23,-272.14 cw(c2574.92,-272.14) 2574.92,-267.45 v2@2610.41,-267.45
VCC5V_USB: C165.1 C166.2 D8.1 J2.1 U8.2 | length 0
  other v2: 1872.99,-327.18
VCC12_TX: C260.2 C266.2 C271.2 C277.2 C281.2 FB3.2 U4.34 U4.46 U4.48 U4.59 | length 852.9
  Top Layer w7: C266.2@771.96,-373.28 C266.2@773.31,-371.93 ; U4.34@779.14,-319.35 779.58,-319.79 779.58,-370.83 782.34,-373.59 ; C260.2@803.64,-371.93 C260.2@804.98,-370.58 ; U4.48@999.61,-319.35 U4.48@999.61,-320.46 ; U4.48@1000.05,-320.9 U4.48@999.61,-320.46 ; C277.2@1018.27,-388.28 1018.27,-373.28 999.61,-354.62 U4.48@999.61,-320.46 ; U4.59@1033.07,-128.41 1088.43,-128.41 C281.2@1105.07,-145.04
  Top Layer w10: C266.2@772.27,-373.59 782.34,-373.59 801.98,-373.59 C260.2@803.64,-371.93
  Top Layer w15: 1004.05,-320.9 v3(1041.11,-320.9)
  Signal L1 w7: v3@1040.76,-320.9 1040.76,-140.22 1052.88,-128.1 v3(1087.2,-128.1)
  Signal L2 w7: v2@833.9,-386.71 854.63,-365.99 854.63,-365.74 876.62,-365.74 855.45,-386.91 848.43,-386.91 ; v2@836.9,-386.71 836.9,-386.91 837.24,-386.58 845.56,-386.58 ; 848.56,-386.58 845.56,-386.58 ; 855.14,-377 845.56,-386.58 ; 879.62,-365.74 954.76,-365.74 ; v1(968.11,-392.47) 968.11,-379.09 ; v1@968.11,-386.91 968.11,-373.53 ; 981.46,-365.74 968.11,-379.09 ; v1(1018.27,-392.47) 1018.27,-379.09 1004.93,-365.74 954.76,-365.74 ; 954.76,-365.74 968.11,-379.09
  other v2: 836.09,-386.91 857.63,-386.91
VCC12A_RX: C261.2 C267.2 C272.2 C278.2 C282.2 FB4.2 U4.4 U4.10 U4.13 | length 402.4
  Top Layer w7: C282.2@951.44,55.84 C282.2@952.37,54.91 ; U4.4@952.37,-16.21 C282.2@952.37,54.91 ; C282.2@952.37,56.84 952.37,55.38 C282.2@952.37,54.91
  Top Layer w8: C261.2@794.63,50.15 C261.2@801.63,50.15 804.91,50.15 808.22,46.84 827.66,46.84 ; U4.13@810.63,-16.21 810.63,32.99 811.61,32.01 846.28,32.01 ; C272.2@830.86,46.04 832.47,44.43 832.71,44.22 846.28,32.01 ; U4.10@857.88,-16.21 857.88,20.42 846.28,32.01
  PWR-1 w7: v1(811.23,52.27) 926.49,52.27 v1(939.44,39.32) v1@940.11,38.65
VCC12D_RX: C268.2 C283.2 FB5.2 U4.1 | length 184.3
  Top Layer w7: C283.2@999.79,55.84 C268.2@1025.6,55.84
  Top Layer w8: U4.1@999.61,-16.21 C283.2@999.61,55.87
  Top Layer w10: C268.2@1026.26,55.71 1043.47,55.71 1052.25,64.49 1052.25,87.09 1042.13,97.22 1042.13,102.66 1036.82,107.97 1031.38,107.97 FB5.2@1031.38,109.47
VCC33_RX: C258.2 C264.2 C274.2 C279.2 FB1.2 U4.7 U4.62 | length 550.7
  Top Layer w7: U4.62@1033.07,-81.17 C274.2@1105.07,-81.17
  Top Layer w8: U4.7@905.12,-16.21 v1(905.12,31.77) 905.12,42.65 ccw(c900.93,42.65) 900.93,46.84 901.84,47.75 911.79,47.75 C279.2@911.79,48.28
  Top Layer w10: 922.76,48.81 922.76,84.45 934.27,95.96 934.27,97.66 938.27,101.66 C258.2@941.77,101.66
  Signal L1 w6: v1(905.12,31.77) 905.12,41.35 cw(c916.54,41.35) 916.54,52.76 1087.15,52.76 cw(c1087.15,41.03) 1098.88,41.03 v6(1098.88,-81.12)
VCC33_TX: C259.2 C265.2 C270.2 C276.2 C280.2 FB2.2 U4.16 U4.25 U4.33 U4.45 U4.47 | length 1960.4
  Top Layer w7: v1(602.26,2.39) 603.04,1.61 696.13,1.61 696.88,0.85 736.71,0.85 722.27,-13.58 ; C265.2@683.12,-12.04 762.95,-12.04 763.39,-12.48 U4.16@763.39,-16.21 722.27,-16.21 ; v1(722.13,-406.79) 722.13,-395.45 741.9,-375.68 C276.2@743.32,-375.68 ; 722.27,-14.98 680.71,-31.44 651,-31.44 ccw(c651,-44.44) 638,-44.44 638,-136.51 ccw(c665.21,-136.59) 665.21,-163.8 679.75,-163.8 cw(c679.75,-176.42) 688.16,-167 v1(697.96,-175.65) U4.25@729.93,-175.65 ; C276.2@745.72,-373.28 748.13,-370.87 748.13,-370.22 763.39,-354.95 U4.33@763.39,-319.35 ; U4.47@983.86,-319.35 983.86,-364.28 992.86,-373.28 C280.2@992.86,-388.28 v1(992.86,-392.47)
  Signal L1 w15: v1(602.26,2.39) 570.93,33.73 468.32,33.73 451.52,16.93 451.52,-48.36 484.98,-81.82 484.98,-373.23 498.66,-386.91 702.26,-386.91 v1(722.13,-406.79)
  PWR-1 w10: v1(722.13,-406.79) 722.13,-372.67 733.2,-361.6 888.86,-361.6 ; v2@881.24,-386.91 881.24,-369.22 888.86,-361.6 ; v1(992.86,-392.47) 992.51,-392.12 992.51,-372.93 981.18,-361.6 888.86,-361.6
  Bottom Layer w7: C270.2@688.98,-167.46 691.38,-169.87 698.76,-174.32 v1@700.96,-175.65
  other v2: 880.42,-386.91 901.97,-386.91
VCC_1P8A: C43.1 U7.44 | length 146.1
  Bottom Layer w4.1: C43.1@1353.68,-102.47 1353.68,-98.97 1388.99,-63.67 1388.99,-3.14 1395.94,3.81 U7.44@1418.21,3.81
VCC_1P8D: C42.1 U7.48 | length 66.8
  Top Layer w7: C42.1@1367.68,34.48 1369.8,34.48 1375.3,39.98 v2(1375.3,54.26)
  Bottom Layer w7: v2(1375.3,54.26) 1377.67,54.26 1382.34,58.93 U7.48@1416.03,58.93
VCC_1V2: C287.2 C292.2 C293.2 FB3.1 FB4.1 FB5.1 FB6.1 L11.2 R118.2 | length 1954.4
  Top Layer w10: FB4.1@621.5,35.95 628.31,29.14 FB4.1@628.31,28.51 ; FB5.1@1031.38,157.59 1038.14,164.35 1213.4,164.35 cw(c1213.4,144.28) 1227.55,158.51 cw(c1213.4,144.28) 1227.63,158.43 cw(c1213.4,144.28) 1233.47,144.28 1233.47,-144.04 cw(c1210.7,-144.04) 1225.32,-161.49 1217.51,-168.03 FB6.1@1210.7,-178.78
  Top Layer w15: v2(602.26,35.95) FB4.1@621.5,35.95
  Bottom Layer w10: v2(602.26,35.95) 862.61,35.95 985.29,158.63 v1(1033.86,158.63) v1(1052.79,158.63) 1110.92,158.63 cw(c1110.92,119.94) 1149.61,119.94 L11.2@1149.61,-107.79 ; v2(836.09,-411.69) 836.09,-436 840.65,-440.56 866.84,-440.56 ; 836.66,-426.13 855.63,-426.13 ; v2(857.63,-411.69) 857.63,-426.13 857.63,-431.35 866.84,-440.56 ; R118.2@1084.6,-282.77 1083.51,-283.86 1062.97,-283.86 1054.1,-292.73 1054.1,-428.61 1042.15,-440.56 866.84,-440.56 ; 1137.77,-176.6 ccw(c1139.5,-176.6) 1139.5,-178.33 v2(1194.96,-178.33)
VCC_1V8: C28.2 C29.2 L5.2 R3.2 R87.1 R93.2 R111.1 R112.1 R140.1 | length 4075.7
  Top Layer w10: 1345.25,178.52 ccw(c1384.14,139.69) 1329.18,139.69 1329.18,101.6 ccw(c1347.68,101.6) 1347.68,83.1 R3.2@1370.68,83.1 ; 1345.28,178.55 1398.9,232.17 v1(1398.9,232.38) ; R112.1@2307.21,666.47 R112.1@2308.6,665.08 ; R111.1@2327.94,645.38 2327.94,645.74 R112.1@2308.6,665.08 ; v1(2367.05,722.46) 2313.5,668.91 2312.87,668.91 2309.04,665.08 R112.1@2308.6,665.08
  Top Layer w15: R87.1@2446.35,-187.01 2446.35,-190.21 2447.85,-191.71 2550.02,-191.71 2585.91,-155.81 v2(2639.89,-155.81)
  PWR-1 w15: v1(2367.05,722.46) 2378.77,734.18 cw(c2407.05,705.89) 2407.05,745.89 3018.69,745.89 cw(c3018.69,593.5) 3171.08,593.5 3171.08,-128.78 3144.05,-155.81 v2(2639.89,-155.81)
  PWR-2 w15: v2(1669.56,774.45) 1693.22,750.79 2178.6,750.79 2206.93,722.46 v1(2367.05,722.46)
  Bottom Layer w10: 1370.62,629.73 1392.36,639.57 ; R93.2@2356.44,702.11 2354.64,703.91 2354.64,709.56 2367.05,721.97 v1(2367.05,722.46)
  Bottom Layer w15: 1392.36,639.57 1427.41,639.57 ccw(c1427.41,652.12) 1439.95,652.12 1439.95,757.04 cw(c1457.36,757.04) 1457.36,774.45 v2(1669.56,774.45)
  Bottom Layer w20: R140.1@1358.12,612.14 R140.1@1358.12,615.64 1372.12,615.64
  Bottom Layer w25: 1372.12,619.42 1372.12,622.85 ; 1384.2,415.03 1384.2,604.34
VCC_3V3: C27.2 C137.2 C147.2 C176.2 C181.2 C188.2 C190.2 C191.2 R29.2 R50.1 R76.2 R77.2 U1.1H18 U1.1J2 U1.1N8 U2.23 U3.E6 U3.F5 U3.J10 U3.K9 U7.55 | length 1694.6
  Top Layer w6: v2(2175.2,-204.5) 2175.2,-225.47 2175.43,-225.69
  Top Layer w10: v1@2580.07,-441.89 R77.2@2580.07,-424.19
  Top Layer w15: v2(2314.43,-144.45) 2314.58,-144.3 2314.58,-105.6 C191.2@2315.35,-104.83
  PWR-2 w15: v2@2316.43,-144.45 2336.96,-144.45 cw(c2336.96,-162.27) 2354.78,-162.27 2354.78,-296.91 ccw(c2373.85,-296.91) 2365.9,-314.24 ccw(c2373.85,-296.91) 2373.85,-315.98 v2@2395.36,-315.98
  Bottom Layer w7: C181.2@2025.71,164.61 ccw(c2042.99,147.33) 2018.55,147.33 2018.55,42.27 ccw(c2039.23,42.27) 2039.23,21.6 2265.09,21.6 2295.6,-8.91 2409.06,-8.91 2447.35,-47.2 2447.35,-306.38 cw(c2437.91,-306.38) 2437.91,-315.82 v2(2395.51,-315.82)
  Bottom Layer w8: U7.55@1482.37,125.27 1482.37,148.62 ; 2273.99,-144.41 ccw(c2270.53,-142.72) 2274.38,-142.72
  Bottom Layer w10: R50.1@1358.12,741.18 R50.1@1358.4,741.47 ; v2@1358.4,769.69 v2@1358.69,769.98 ; v1@2194.85,632.27 v1(2194.85,632.53) 2295.41,733.08 2325.46,733.08 R29.2@2327.94,730.61 ; 2214.62,-204.5 2215.33,-205.21 ; 2223.77,-181.98 v1(2247.36,-181.98)
  Bottom Layer w15: R50.1@1358.4,741.47 v2@1358.4,769.69 ; v2(2175.2,-204.5) U3.F5@2195.64,-204.5 2214.62,-204.5 ; U3.E6@2215.33,-224.19 2215.33,-205.21 2215.33,-196.63 cw(c2230.33,-196.63) 2219.72,-186.03 2223.77,-181.98 ; 2225.77,-178.98 2225.77,-158.61 cw(c2239.93,-158.61) 2239.93,-144.45 2273.25,-144.45 ; 2273.68,-144.41 2273.99,-144.41 U3.J10@2293.03,-144.41 ; 2274.38,-142.72 U3.K9@2274.38,-125.76 ; U3.J10@2295.07,-144.45 v2(2314.43,-144.45) ; R29.2@2327.94,730.61 R29.2@2328.35,730.61
  other v1: 2579.21,-441.99 2033.47,162.97 1503.23,188.62 1519.27,188.62 1503.23,202.71 1519.27,202.71 2123.94,434.4 2304.9,470.59
  other v2: 1358.12,749.68 1358.12,769.98
VCC_CPVDD: C40.1 U7.38 | length 105.8
  Bottom Layer w4.1: C40.1@1353.68,-142.47 1353.68,-138.97 1360.63,-132.02 1360.95,-132.02 1369.79,-123.18 1369.79,-97.4 1388.32,-78.87 U7.38@1416.03,-78.87
VCC_CPVSS: C41.2 U7.35 | length 84.3
  Top Layer w4.1: v1(1417.97,-169.97) 1422.96,-164.98 ccw(c1412.36,-154.37) 1427.36,-154.37 C41.2@1427.36,-139.3
  Bottom Layer w4: v1(1417.97,-169.97) 1417.97,-119.97 U7.35@1418.21,-120.21
VCC_DDR: C71.2 C73.2 C108.2 C110.2 C112.2 C114.2 C116.2 C178.2 C197.2 C199.2 C201.2 C204.1 C206.2 C208.2 C210.2 C212.2 C214.2 C217.2 C220.2 C228.2 C232.2 C236.2 C241.2 C245.2 C246.2 C247.2 C248.2 L7.1 R25.2 R40.2 R98.2 U1.1D5 U1.1D6 U1.1D7 U1.1D8 U1.1D9 U1.1E4 U1.1F4 U1.1G4 U7.26 U12.A4 U12.A9 U12.AB4 U12.AB9 U12.F5 U12.F8 U12.H1 U12.H5 U12.H8 U12.H12 U12.K1 U12.K3 U12.K10 U12.K12 U12.N1 U12.N3 U12.N10 U12.N12 U12.R1 U12.R5 U12.R8 U12.R12 U12.U5 U12.U8 | length 1636.9
  Top Layer w7: U12.A4@2826.84,612.53 2826.84,661.11 cw(c2862.73,661.15) v1(2837.36,686.53)
  Top Layer w8: R25.2@1468,-319.37 1469.33,-320.7 1512.04,-320.7 v2@1523.54,-309.2 ; v1(2698.81,254.26) U12.R1@2732.35,254.26 ; v1(2698.81,382.21) U12.K1@2732.35,382.22 ; v1(2698.81,433.39) U12.H1@2732.35,433.4 ; v1(2710.63,304.9) 2710.91,305.17 2732.08,305.17 U12.N1@2732.35,305.44 ; v1(2779.6,292.65) U12.N3@2795.34,305.44 ; v1(2779.6,395.01) U12.K3@2795.34,382.22 ; U12.AB4@2826.84,75.13 v1(2842.59,62.33) ; U12.U5@2858.34,203.08 v1(2874.09,190.28) ; U12.R5@2858.34,254.26 v1(2874.09,241.46) ; U12.H5@2858.34,433.4 v1@2871.9,444.42 ; U12.F5@2858.34,484.58 v1(2874.09,497.37) ; v1(2937.08,190.28) U12.U8@2952.82,203.08 ; v1(2937.08,241.46) U12.R8@2952.82,254.26 ; v1(2937.08,497.37) U12.F8@2952.82,484.58 ; v1@2939.26,444.41 U12.H8@2952.82,433.4 ; U12.AB9@2984.32,75.13 2984.49,75.13 2999.91,59.71 v1(3000.07,59.71) ; U12.A9@2984.32,612.53 2984.32,612.91 2997.7,626.29 ccw(c2986.46,637.53) 3002.36,637.53 v1(3002.36,686.53) ; U12.N10@3015.82,305.44 v1(3031.57,292.64) ; U12.R12@3078.81,254.26 v1(3094.56,241.46) ; U12.N12@3078.81,305.44 v1(3094.56,292.64) ; U12.H12@3078.81,433.4 v1(3094.56,446.19) ; U12.K10@3015.82,382.22 v1(3031.57,395.01) U12.K10@3015.82,382.22 ; U12.K12@3078.81,382.22 v1(3094.56,395.01) U12.K12@3078.81,382.22
  Top Layer w10: v1(2268.71,253.44) v1(2286.8,271.54) v1(2304.9,289.64) v1(2322.99,307.73) v1(2341.09,325.83) ; v1(2304.9,398.21) v1(2322.99,380.11) v1(2341.09,362.02) ; U1.1D5@2341.44,326.21 U1.1D5@2341.44,327.48 ; U1.1E4@2341.44,361.16 U1.1E4@2341.44,361.63 ; U1.1D5@2341.46,327.5 U1.1E4@2341.46,361.15
  PWR-2 w10: v1(1550.77,-169.97) 1556.21,-174.4 cw(c1549.89,-182.15) 1556.99,-175.11 cw(c1536.8,-195.27) 1565.34,-195.27 ; v2(1565.34,-282.33) 1565.34,-195.32
  Bottom Layer w5.7: v1@2322.99,380.91 2322.99,392 cw(c2337.99,392) 2327.38,402.6 ; 2327.39,402.61 2374.41,449.64
  Bottom Layer w6: v1@1550.47,-169.97 1550.87,-169.57 1550.87,-145.61 U7.26@1551.27,-145.21
  Bottom Layer w8: C112.2@2267.73,248.18 C112.2@2268.71,249.15 ; v1(2268.71,253.44) 2282.91,267.65 2283.08,267.65 C110.2@2286.89,271.46 ; C110.2@2289.72,270.16 2289.72,274.46 v1(2322.99,307.73) 2338.86,323.6 2346.8,323.6 2339.72,330.68 2339.72,363.39 v1(2322.99,380.11) ; 2374.41,449.64 2378.21,453.43 ccw(c2354.03,477.61) 2386.75,467.66 ccw(c2356.96,476.72) 2388.04,478.55 cw(c2449,478.55) 2405.89,521.65 R40.2@2445.31,561.06 ; C197.2@2967.36,30.03 ccw(c2967.36,37.36) 2972.54,32.18 v1(3000.07,59.71) ; C220.2@2977.36,690.86 2981.83,686.39 v1@3001,686.39 ; v1(3094.56,292.64) 3094.68,292.53 3114.36,292.53 C214.2@3126.78,304.95
  Bottom Layer w10: C228.2@2837.36,72.99 cw(c2837.36,67.75) 2842.59,67.75 v1(2842.59,62.33) ; v1(3094.56,446.19) 3132.81,446.19 C201.2@3133.81,445.18
  other v1: 2872.09,444.19 2939.08,444.19
  other v2: 1524.25,-307.87 1544.79,-307.87 1565.34,-307.87 1524.25,-282.33 1544.79,-282.33 3118.98,29.51 3142.98,58.51 3142.98,86.51
VCC_WL: C3.2 C4.2 R50.2 U17.36
  other v2: 1305.82,769.98 1327.97,769.98
VCCA1V8_IMAGE: C24.2 C153.2 C161.2 C163.2 C168.2 C169.1 C172.2 C174.2 U1.1G17 U1.1P9 U1.1P12 U1.1P13 U1.1R10 U7.6 | length 2208.8
  Top Layer w7: v1(2051.56,434.4) v1(2087.75,434.4)
  Top Layer w10: v1(2015.38,362.01) U1.1P12@2033.47,380.11
  Signal L1 w5.5: 1932.39,282.22 1941.99,272.62 ; 1932.42,282.26 cw(c1939.94,289.78) 1932.42,297.29 1997.14,362.01 v1(2015.38,362.01) ; 1941.99,272.59 2047.53,167.06 ccw(c2057.35,176.83) 2057.3,162.97 v1(2069.66,162.97) ; v1@2015.38,362.5 2051.56,398.69 v1(2051.56,434.4)
  PWR-2 w10: v1(1772.56,80.6) 1793.68,101.73 1793.68,228.5 1758.27,263.92 1614.72,263.92 1518.21,360.43 1518.21,693.43 1533.43,708.65 1832.79,708.65 1848.55,692.89 v2(1848.55,673.21)
  Bottom Layer w5: U7.6@1686.51,30.37 1725.44,30.37 1733.11,38.04 1733.11,79.14 1750.18,96.21 1750.18,100.53 C24.2@1756.68,107.03
  Bottom Layer w8: C24.2@1756.79,105.03 1756.79,103.42 1761.68,98.53 C24.2@1764.22,98.53
  Bottom Layer w10: v2(1848.55,673.21) 1848.55,623.21 ccw(c1901.84,623.21) 1864.13,585.56 ; 1864.16,585.53 1982.91,466.78 2019.29,466.78 2028.4,457.68 C174.2@2028.5,457.68 ; C172.2@2009.6,403.19 2010.23,403.19 C169.1@2028.49,421.45 ; C169.1@2028.49,421.55 2043.22,436.29 2044.42,436.29 C168.2@2046.65,438.51 ; C174.2@2028.74,457.68 2047.28,439.14 C168.2@2046.65,438.51 ; C168.2@2047.93,436.5 C163.2@2083.61,436.5 ; C168.2@2047.93,437.23 C168.2@2046.65,438.51
VCCA1V8_PMU: C23.2 C120.1 C125.2 R82.1 R104.1 U1.1N18 U7.5 | length 2879.7
  Top Layer w15: C23.2@1676.68,-58.41 C120.1@1676.68,-7.27
  PWR-1 w8: v1@1713.15,44.77 1694.79,44.77 1685.88,53.68 1685.88,73.89 1802.29,190.3 1802.29,277.41 1810.85,285.98 1910.46,285.98 v1(1942.99,253.44)
  PWR-2 w10: v1@1715.15,43.45 1689.01,43.45 1683.15,49.31 1683.15,171.32 1500.99,353.48 1500.99,704.39 1525.6,729 2170.01,729 2196.99,702.01 2754.58,702.01 v2(2775.43,722.86)
  Bottom Layer w8: U7.5@1686.51,45.15 v1@1713.15,45.15
  Bottom Layer w10: R82.1@2566.2,719.08 2566.2,703.87 ccw(c2581.78,703.87) 2581.78,688.29 2698.54,688.29 ccw(c2698.54,741.6) 2736.22,703.89 ; 2736.23,703.91 2773.36,741.03 R104.1@2775.86,741.03 2775.86,722.86 v2(2775.43,722.86)
  other v1: 1715.15,43.77
VCCA_1V8: C21.2 C122.1 C127.2 C136.2 C140.2 C142.2 C145.2 C154.2 C155.2 R60.2 R61.1 R62.1 R63.1 U1.1D15 U1.1D16 U1.1H4 U1.1H16 U1.1J3 U1.1K17 U7.3 | length 1001.3
  Top Layer w10: v1(2142.04,126.78) v1(2160.14,144.87)
  Signal L2 w10: 2060.39,39.22 2099.94,39.22 2117.77,21.4 2148.21,21.4 2163.67,36.85 2353.68,36.85 cw(c2353.68,-15.64) 2390.79,21.49 2390.85,21.44 2462.86,-50.58 ccw(c2485.95,-27.47) 2485.95,-60.14 v1(2522.25,-60.14)
  Bottom Layer w5: R62.1@2558.6,-34.01 2571.21,-34.01 ccw(c2571.21,-28.95) 2576.28,-28.95 2576.28,29.51 ccw(c2570.9,29.51) 2570.9,34.89 R61.1@2558.6,34.89
  Bottom Layer w5.5: C154.2@2015.37,217.48 v1(2015.37,217.25) 2015.37,198.96 2028.23,186.1 2038.55,186.1 2050.69,198.24 2064.73,198.24 2066.66,196.31 2067.26,196.31 2069.19,198.24 C145.2@2071.84,195.59
  Bottom Layer w8: v1(2142.04,126.78) v1(2160.14,144.87) ; C136.2@2285.83,459.25 2286.8,458.28 v1(2286.8,452.49) 2287.53,451.76 2287.53,445.42 C127.2@2301.31,431.64 ; v1(2286.8,416.3) 2286.8,417.12 C127.2@2301.31,431.64 ; C127.2@2301.66,431.29 C127.2@2301.31,431.64 ; C127.2@2302.18,432.5 C127.2@2301.31,431.64
  Bottom Layer w10: v1(1828.72,197.1) ccw(c1850.37,197.1) 1850.37,175.46 1905.74,175.46 cw(c1905.74,171.8) 1909.4,171.8 1909.4,147.78 ccw(c1916.93,147.78) C122.1@1916.93,140.24 C122.1@1924.43,139.43 ; C140.2@2530.35,-60.3 R63.1@2530.35,-34.01 R62.1@2558.6,-34.01
  other v1: 1816.49,185.67 2069.66,199.16
VCCIO6: C144.2 R93.1 U1.1L4 U1.1L5 | length 267.6
  Bottom Layer w6: 2242.56,490.48 ccw(c2235.17,497.85) 2245.61,497.85 2245.61,528.57
  Bottom Layer w7: v1@2214.42,452.49 v1(2214.42,452.96) ; v1@2214.66,452.73 v1(2232.52,470.59) ; C144.2@2227.44,475.36 2229.14,477.06 2242.55,490.47 ; 2245.61,528.57 cw(c2267.58,528.57) 2252.07,544.13 2272.96,565.03 ccw(c2262.36,575.64) 2277.36,575.64 2277.36,612.08 cw(c2308.61,612.08) 2286.49,634.16 ; 2286.51,634.18 R93.1@2330.31,677.98
VCCIO_ACODEC: C17.2 C180.2 U1.1D13 U7.28 | length 2038.5
  Top Layer w5.6: v1(1517.75,-181.49) 1527.47,-192.35 1528.6,-193.48 1529.3,-194.18 ccw(c1535.26,-182.68) 1535.26,-195.63 1577.29,-195.63 ccw(c1577.29,-165.57) 1607.36,-165.57 1607.36,-159.1 cw(c1623.12,-159.1) 1611.21,-148.77 cw(c1623.12,-159.1) 1611.97,-147.95 C17.2@1618.12,-141.8 ; C17.2@1612.98,-140.76 1612.98,-140.51 C17.2@1613.39,-140.1
  Signal L1 w10: v1@1518.24,-181.49 1518.24,-164.48 cw(c1537.49,-164.48) 1537.49,-145.23 ccw(c1537.49,-158.47) 1524.25,-158.47 v1@1524.25,-165.25 ; v1(1523.76,-165.25) 1523.76,-158.47 cw(c1537,-158.47) 1537,-145.23 1627.7,-145.23 cw(c1627.7,-165.85) 1648.32,-165.85 1648.32,-206.86 ccw(c1676.14,-206.86) 1676.14,-234.68 2081.9,-234.68 cw(c2081.9,-263.73) 2110.96,-263.73 2110.96,-337.99 ccw(c2136.08,-337.99) 2136.08,-363.11 2416.94,-363.11 ccw(c2416.94,-336.41) 2443.64,-336.41 2443.64,-59.18 ccw(c2426.65,-59.18) 2440.56,-49.42 2434.13,-42.99 ccw(c2418.6,-58.52) 2418.6,-36.55 2404.08,-36.55 cw(c2404.08,-8.62) 2384.32,-28.37 2275.43,80.52 cw(c2288.48,93.58) 2270.02,93.61 2270.02,139.18 2270.02,139.25 ccw(c2246.96,139.23) 2263.27,155.53 2263.22,155.58 2245.55,173.25 2245.49,173.32 ccw(c2226.51,153.95) 2226.54,181.06 2226.48,181.06 v1(2196.33,181.06)
  Bottom Layer w8: v1(1517.75,-181.49) 1517.75,-180.79 1523.65,-174.9 U7.28@1523.65,-143.59